# EAGLE board pours_and_holes (EAGLE 9.6.2)
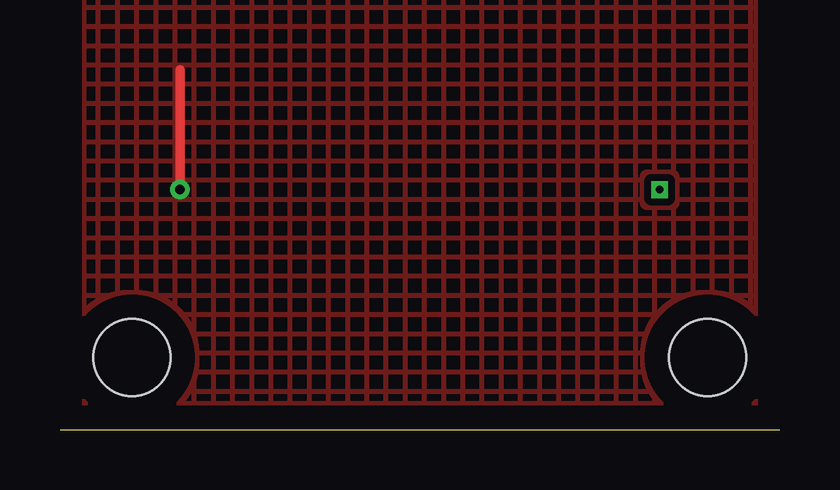
[diagram p0: board, top side]
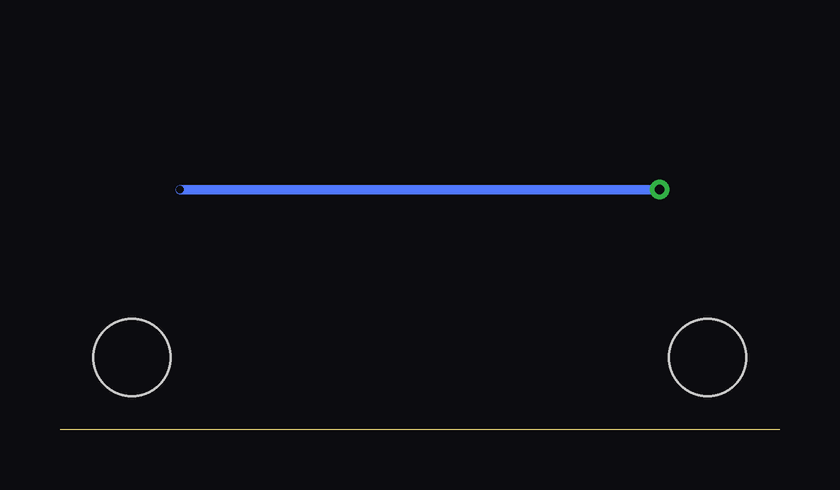
[diagram p1: board, bottom side, seen from below]

Size 30 x 0 mm. Coordinates in mm from the lower left corner, seen from the top.
Outline: 0,0 30,0
Copper layers used: Top, Bottom
Holes 3.2 mm at 3,3 27,3

## Placement (x,y rotation side)
J1  HDR  [PIN2]  5,15 0 top
J2  HDR  [PIN2]  25,15 180 top

## Library data of the parts
J1 J2 = hand

## Nets
GND: J1.1
VCC: J2.1

## Tracks (layer width: path | path; a pad name or v marks a point on that pad's centre or on a via)
GND  (via drill 0.4 pad 0.8)
  Top 0.4: 5,15 v5,10
  Bottom 0.4: v5,10 25,10
  pour Top (isolate 0.3, rank 2, no thermals, hatched): 1,1 29,1 29,19 1,19
  cutout Bottom: 10,5 12,5 12,7
VCC  (via drill 0.3 pad 0.6 layers 1-2)
  other vias: 25,10